# Altium PCB Main-PCB-v1.1.PcbDoc (part 2 of 2)
Units mil, origin at the board's own origin, x right, y up, seen from the top; angles counter-clockwise.
Board outline 2306.6 x 2155.25 mil, 2 copper layers (Top Layer, Bottom Layer), stack 57 mil thick; 70 components, 51 nets, 237 pads, 85 vias.
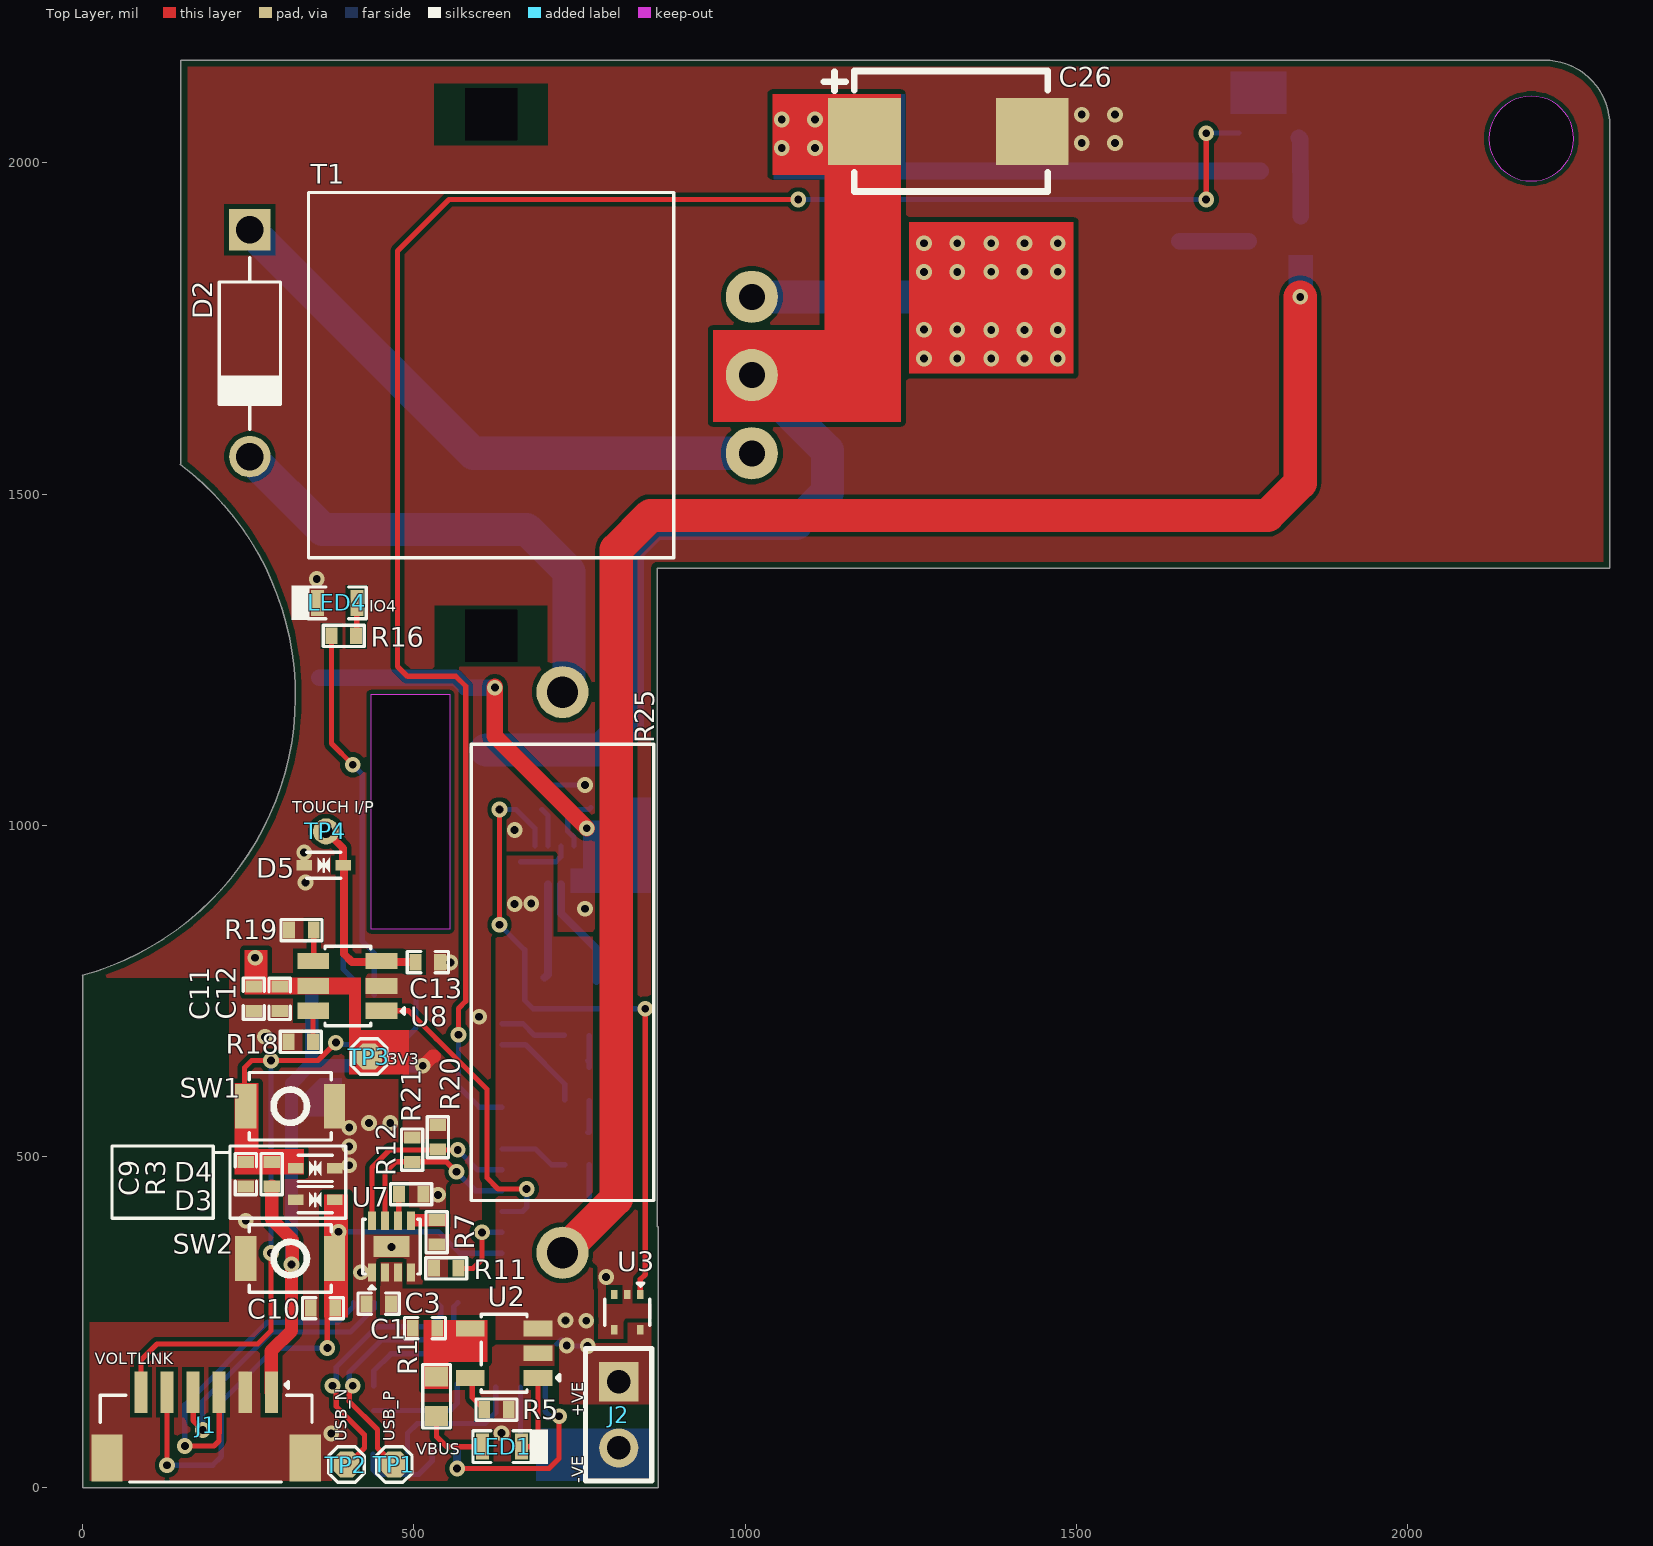
[diagram p0: Top Layer view]

## Part data (continued)
R27: library part RC0402FR-07680RL, "RES 680 OHM 1% 1/16W 0402", Case Code (Imperial)=0402, Case Code (Metric)=1005, Manufacturer=Yageo, Max Operating Temperature=155°C, Max Power Dissipation=63mW, Min Operating Temperature=-55°C, Resistance Tolerance=1%, Resistor Type="Thick Film", Supplier Part Number 1=7948052, Temperature Coefficient=100ppm/°C, Voltage Rating=50V, Case/Package=0402, Category="Chip SMD Resistors", ComponentLink1Description=https://datasheet.ciiva.com/12667/pyu-rc0402-51-rohs-l-6-r-12667916.pdf?src-supplier=Mouser, ComponentLink1URL=https://datasheet.ciiva.com/12667/pyu-rc0402-51-rohs-l-6-r-12667916.pdf?src-supplier=Mouser, ComponentLink2Description=https://datasheet.ciiva.com/7850/1018594-7850071.pdf?src-supplier=Element14, ComponentLink2URL=https://datasheet.ciiva.com/7850/1018594-7850071.pdf?src-supplier=Element14, ComponentLink3Description=https://datasheet.ciiva.com/7850/1018594-7850070.pdf?src-supplier=Element14, ComponentLink3URL=https://datasheet.ciiva.com/7850/1018594-7850070.pdf?src-supplier=Element14, ComponentLink4Description=https://datasheet.ciiva.com/17042/pyu-rc0402-51-rohs-l-6-r-17042399.pdf?src-supplier=Future+Electronics, ComponentLink4URL=https://datasheet.ciiva.com/17042/pyu-rc0402-51-rohs-l-6-r-17042399.pdf?src-supplier=Future+Electronics, Construction=Rectangular, Depth=0.5mm, Features="Moisture Resistant", Item Type=Resistor, Lead Free="Lead Free", Length=1mm, Manufacturer Part Number=RC0402FR-07680RL, Military Standard=Not, Number of Terminations=2, Packaging="Tape and Reel", Power Rating=63mW, Pricing 1="10000=0.0011, 100000=0.0011, 300000=0.001, 750000=0.001, 2000000=0.0009 (USD)", Reach SVHC Compliant=No, Resistance=680R, RoHS=Yes, RoHS Compliant=Yes, Series=RC, Size Code=0402, Stock 1=5080000, Supplier 1="Future Electronics", Termination=SMD/SMT, Tolerance=1%, Voltage Rating (AC)=50V
SW1 SW2: "SWITCH TACTILE SPST-NO 0.05A 12V", Contact Current Rating=50mA, Contact Resistance=100mR, Insulation Resistance=100MR, LCSC Part Number=C231329, Manufacturer=Omron, Max Operating Temperature=70°C, Max Voltage Rating (DC)=12V, Min Operating Temperature=-25°C, Operating Force=1.5N, Package Quantity=1, Ratings="Dust Proof,IP40", Supplier Part Number 1=SW1020DKR-ND, Actuator Length=0.4mm, Actuator Type=Standard, ComponentLink1Description=http://www.farnell.com/datasheets/60838.pdf?src-supplier=Farnell, ComponentLink1URL=http://www.farnell.com/datasheets/60838.pdf?src-supplier=Farnell, ComponentLink2Description=http://www.farnell.com/datasheets/60838.pdf?src-supplier=Element14, ComponentLink2URL=http://www.farnell.com/datasheets/60838.pdf?src-supplier=Element14, ComponentLink3Description=https://omronfs.omron.com/en_US/ecb/products/pdf/en-b3u.pdf?src-supplier=Digi-Key, ComponentLink3URL=https://omronfs.omron.com/en_US/ecb/products/pdf/en-b3u.pdf?src-supplier=Digi-Key, ComponentLink4Description=http://www.omron.com/ecb/products/pdf/en-b3u.pdf?src-supplier=Digi-Key, ComponentLink4URL=http://www.omron.com/ecb/products/pdf/en-b3u.pdf?src-supplier=Digi-Key, ComponentLink5Description=https://www.distrelec.biz/Web/Downloads/he/et/B3U_eng_datasheet.pdf?mime=application%2Fpdf&src-supplier=Distrelec, ComponentLink5URL=https://www.distrelec.biz/Web/Downloads/he/et/B3U_eng_datasheet.pdf?mime=application%2Fpdf&src-supplier=Distrelec, ComponentLink6Description=http://www.onlinecomponents.com/productFiles/mf-OM/en-b3u.pdf?src-supplier=Onlinecomponents.com, ComponentLink6URL=http://www.onlinecomponents.com/productFiles/mf-OM/en-b3u.pdf?src-supplier=Onlinecomponents.com, ComponentLink7Description=https://www.verical.com/server-webapp/html/getDatasheet?partID=552554&src-supplier=Verical, ComponentLink7URL=https://www.verical.com/server-webapp/html/getDatasheet?partID=552554&src-supplier=Verical, ComponentLink8Description=http://www.farnell.com/datasheets/1685550.pdf?src-supplier=Element14, ComponentLink8URL=http://www.farnell.com/datasheets/1685550.pdf?src-supplier=Element14, ComponentLink9Description=http://www.farnell.com/datasheets/2610940.pdf?src-supplier=Farnell, ComponentLink9URL=http://www.farnell.com/datasheets/2610940.pdf?src-supplier=Farnell, ComponentLink10Description=https://www.alliedelec.com/m/d/4c8a9ef82804fc3c241a13c1e298fd73.pdf?src-supplier=Allied+Electronics, ComponentLink10URL=https://www.alliedelec.com/m/d/4c8a9ef82804fc3c241a13c1e298fd73.pdf?src-supplier=Allied+Electronics, Contact Material=Silver, Current Rating=50mA, Depth=2.5mm, Electrical Life=200000Cycles, Height=1.2mm, Illumination Type=Non-Illuminated,Illuminated, Item Type=Switch, Lead Free="Lead Free", Length=4mm, Manufacturer Part Number=B3U-1000P, Max Current Rating=50mA, Mechanical Life=200000Cycles, Mount="Surface Mount", Orientation=Straight, Packaging="Tape and Reel", Pricing 1="1=1, 10=0.961, 25=0.9064, 50=0.7976, 100=0.7251, 250=0.68888, 500=0.67074, 1000=0.52571 (USD)", REACH SVHC=Unknown, Stock 1=116454, Supplier 1=Digi-Key, Switch Function=Off-Mom, Switch Travel=0.15mm, Termination=SMD/SMT, Throw Configuration=SPST, Voltage Rating (DC)=12V, Weight=0.000776oz, Width=3mm
T1: "15KV Arc Ignition High Voltage Inverter Step Up Boost Coil Transformer Pulse Ignition 1.4x1.4x0.7cm Lighter Accessories", Manufacturer=Aideepen, ComponentLink1Description=Aliexpress, ComponentLink1URL=https://vi.aliexpress.com/item/1005006061113490.html, Item Type=Transformer, Manufacturer Part Number="15KV step-up coil transformer"
TP1 TP2 TP3: "Test Point ON", Item Type="Test Point", Manufacturer Part Number="TEST POINT 0.5mm Dia"
TP4: "Test pad"
U1: "SOT-23-6 Battery Management ROHS", LCSC Part Number=C18186335, Manufacturer="Shenzhen Fuman Elec", Package=SOT-23-6, ComponentLink1Description=LCSC, ComponentLink1URL=https://www.lcsc.com/product-detail/Battery-Management_Shenzhen-Fuman-Elec-DW01-A-J_C18186335.html, Item Type=IC, Manufacturer Part Number=DW01-A/J
U2: "4.5V~5.5V 锂离子/Polymer 1 600mA SOT-23-5 Battery Management ICs ROHS", LCSC Part Number=C382138, Manufacturer=TPOWER, Package=SOT-23-5, ComponentLink1Description=LCSC, ComponentLink1URL=https://www.lcsc.com/product-detail/Battery-Management-ICs_TPOWER-TP4054_C382138.html, Item Type=IC, Manufacturer Part Number=TP4054
U3: "Active Low 1 VSOF-5 Monitors & Reset Circuits ROHS", Case/Package=VSOF, LCSC Part Number=C2067200, Manufacturer=Rohm, Max Operating Temperature=105°C, Max Power Dissipation=210mW, Max Reset Threshold Voltage=6.09V, Max Supply Current=1.98uA, Max Supply Voltage=10V, Min Operating Temperature=-40°C, Min Reset Threshold Voltage=5.91V, Min Supply Voltage=1.2V, Number of Voltages Monitored=1, Operating Supply Current=900nA, Package Quantity=3000, Supplier Part Number 1=1717448, Threshold Voltage=6V, Accuracy=1%, Category="Voltage Supervisors", ComponentLink1Description=https://datasheet.ciiva.com/1974/bd48xxg-e-1974994.pdf?src-supplier=Digi-Key, ComponentLink1URL=https://datasheet.ciiva.com/1974/bd48xxg-e-1974994.pdf?src-supplier=Digi-Key, ComponentLink2Description=https://datasheet.ciiva.com/8133/bd48xxg-e-8133113.pdf?src-supplier=Avnet, ComponentLink2URL=https://datasheet.ciiva.com/8133/bd48xxg-e-8133113.pdf?src-supplier=Avnet, ComponentLink3Description=LCSC, ComponentLink3URL=https://www.lcsc.com/product-detail/Monitors-Reset-Circuits_ROHM-Semicon-BD4830FVE-TR_C2067200.html, Item Type=IC, Lead Free="Lead Free", Manufacturer Part Number=BD4830FVE-TR, Mounting Technology="Surface Mount", Number of Monitored Inputs=1, Packaging="Tape and Reel", Pins=5, Pricing 1="1=0.64000, 10=0.54900, 25=0.51200, 100=0.40960, 250=0.38032, 500=0.32182, 1000=0.24868 (USD)", Reset="Active Low", RoHS=Yes, RoHS Compliant=Yes, Series=BD48xxx, Stock 1=5990, Supplier 1=Rs, Type="Simple Reset/Power-On Reset,Voltage Detector", Watchdog Timer=No
U4: "20V 6A 22mΩ@4.5V,4.5A 2W 2PCSNChannel(Common Drain) SOT-23-6 MOSFETs ROHS", LCSC Part Number=C841290, Manufacturer="Shenzhen Fuman Elec", Package=SOT-23-6, ComponentLink1Description=LCSC, ComponentLink1URL=https://www.lcsc.com/product-detail/MOSFETs_Shenzhen-Fuman-Elec-8205A_C841290.html, Item Type=IC, Manufacturer Part Number=.8205A
U5: "Non-Isolated PoL Module DC DC Converter 1 Output 1.2 ~ 5.3V 2A 1.6V - 5.5V Input", LCSC Part Number=C5219190, Manufacturer="Texas Instruments", Height=600um, Item Type=IC, Length=2.1mm, Manufacturer Part Number=TPS631000DRLR, Pins=8NUMBER, Pricing="1=1.49, 10=1.34, 50=1.34, 100=1.08, 1000=0.733, 10000=0.631 (USD)", RoHS=No, Stock=19488, Supplier=Mouser, Thickness=550um, Topology=6153TopologyType, Width=1.2mm
U6: "RF TXRX MODULE BT PCB TRACE SMD", LCSC Part Number=C2934569, Manufacturer="Espressif Systems", Package=SMD,13.2x16.6mm, Supplier Part Number=1965-ESP32-C3-MINI-1-H4CT-ND, Category=Uncategorized, ComponentLink1Description=LCSC, ComponentLink1URL=https://www.lcsc.com/product-detail/WiFi-Modules_Espressif-Systems-ESP32-C3-MINI-1-H4_C2934569.html, Item Type=Module, Manufacturer Part Number=ESP32-C3-MINI-1-H4, Pricing="1=1.9 (USD)", RoHS=No, Stock=35793, Supplier=Digi-Key
U7: "IC BATT MON LI-ION 1CELL 8TDFN", LCSC Part Number=C2682616, Manufacturer=Maxim, Max Operating Temperature=85°C, Min Operating Temperature=-20°C, Operating Supply Current=23uA, Operating Supply Voltage=4.5V, Output Voltage=400mV, Package Quantity=10000, Supplier Part Number 1=700-MAX17048G+T10, Category="Battery Management", ComponentLink1Description=https://datasheet.ciiva.com/14083/max17048-max17049-14083973.pdf?src-supplier=Digi-Key, ComponentLink1URL=https://datasheet.ciiva.com/14083/max17048-max17049-14083973.pdf?src-supplier=Digi-Key, Contact Plating=Tin,Matte, Item Type=IC, Manufacturer Part Number=MAX17048G+T10, Mount="Surface Mount", Number of Pins=8, Packaging="Tape and Reel", Pricing 1="1=3.34000, 10=3.00000, 50=2.84000, 100=2.46000, 1000=1.89000, 10000=1.83000 (USD)", Radiation Hardening=No, RoHS=Yes, RoHS Compliant=Yes, Series=ModelGauge™, Stock 1=41293, Supplier 1=Mouser
U8: "SOT-23-6L Touch Sensors ROHS", LCSC Part Number=C2890349, Manufacturer="Tontek Design Tech", Package=SOT-23-6L, ComponentLink1Description=LCSC, ComponentLink1URL=https://www.lcsc.com/product-detail/Touch-Sensors_Tontek-Design-Tech-TTP233H-BA6_C2890349.html, Item Type=IC, Manufacturer Part Number=TTP233H-BA6

## Via types
v1: diameter 23.62, hole 11.81, Top Layer to Bottom Layer, tented both sides, 84 vias
v2: diameter 23.62, hole 11.81, Top Layer to Bottom Layer, 1 vias

## Nets (pads, with @x,y where several pads share a name; then routed paths per layer and width w, separated by ;. In a path a pad name is that pad's centre, name@x,y a point inside that pad or via, vN(x,y) a via of type N, cw(c..) or ccw(c..) an arc to the next point about the centre after c; other vN are vias at no path point)
3V3: C5.2 C6.2 C7.2 C8.2 C11.2 C12.2 D1.2 J1.1 R3.1 R7.1 R9.2 R11.1 R15.1 R20.2 R21.2 TP3.1 U5.1 U6.3 U8.5 | length 1493.2
  Top Layer w20: J1.1 284.63,206.39 315.12,236.88 v1(315.12,336.88) 316.13,337.89 316.13,373.87 285.15,404.84 R3.1 ; v1(513.12,636.88) 514.1,636.88 528.51,651.29 530.53,651.29
  Top Layer w25: v1@622.12,1208.88 v1(622.12,1207.88) 622.12,1134.43 v1(760.98,995.57)
  Bottom Layer w20: v1(315.12,336.88) 315.12,609.88 342.12,636.88 ; U6.3 345.61,640.37 342.12,636.88 ; v1(513.12,636.88) 342.12,636.88
  Bottom Layer w25: 356.81,1222.88 563.12,1222.88 578.12,1207.88 v1(622.12,1207.88)
  other v1: 260.12,799.88
3V3_EN: R8.2 U3.1 U5.5 | length 1017.7
  Top Layer w8: v1(629.12,849.88) v1(629.12,1023.88) ; U3.1 841.8,314.56 849.29,322.05 849.29,698.43 v1(849.29,722.88)
  Bottom Layer w8: v1(629.12,849.88) 667.12,811.88 667.12,735.88 680.12,722.88 v1(849.29,722.88) ; v1(629.12,1023.88) R8.2 682.59,995.4 U5.5
ARC_IGNITER: R27.1 U6.16 | length 2834.5
  Top Layer w8: v1(567.12,683.88) 567.12,723.53 578.12,734.53 578.12,1209.88 563.12,1224.88 490.12,1224.88 475.12,1239.88 475.12,1866.88 553.12,1944.88 v1(1080.12,1944.88) ; v1(1696.03,1944.88) 1696.03,2043.79 1696.12,2043.88 v2(1696.12,2044.88)
  Bottom Layer w8: v1(567.12,683.88) 567.12,605.88 598.64,574.35 U6.16@632.98,574.35 ; v1(1080.12,1944.88) v1(1696.03,1944.88) v1@1698.12,1944.88 ; v2(1696.12,2044.88) 1696.62,2045.38 R27.1
BAT_ALERT: R7.2 U7.5
BATT: C3.2 C4.2 C26.1 J2.1 R2.2 R8.1 R26.1 T1.2 U2.3 U3.5 U5.4 U7.2 U7.3 | length 1753
  Bottom Layer w8: 715.12,216.88 716.12,216.88 722.77,223.53 729.58,216.73 729.58,214.53 730.23,213.88 v1(762.12,213.88) ; v1@730.8,213.88 v1(730.8,214.53)
  Bottom Layer w25: 1135.12,1987.86 R26.1
  Bottom Layer w50: 609.12,1113.88 783.12,1113.88 822.12,1152.88 822.12,1415.88 862.12,1455.88 1077.12,1455.88 1124.12,1502.88 1124.12,1565.77 T1.2
  other v1: 760,251.88 728.68,252.53 651.93,881.09 677,881.88 1055.28,2022.68 1105.53,2022.68 1055.28,2065.68 1105.53,2065.68
ESP_EN: C9.1 D3.2 J1.6 R3.2 SW1.2 U6.8 | length 1071.3
  Top Layer w8: J1.6 87.78,192.54 112.12,216.88 264.12,216.88 284.06,236.81 284.06,296.63 v1(284.06,354.14) ; SW1.2@246.22,570.86 244.12,572.96 244.12,633.88 255.12,644.88 v1(284.06,644.88) 355.12,644.88 v1(382.12,671.88)
  Bottom Layer w8: v1(284.06,354.14) v1(284.06,644.88) ; v1(382.12,671.88) 385.12,668.88 478.12,668.88 503.06,693.82 U6.8@503.06,743.65
GND: C1.1 C3.1 C4.1 C5.1 C6.1 C7.1 C8.1 C9.2 C10.2 C11.1 C12.1 C13.1 C26.2 D1.1 D3.1 D4.1 D5.1 J1.2 J1.MP1 J1.MP2 LED2.2 LED3.2 LED4.2 LED5.2 Q2.3 Q3.2 R5.1 R6.1 R12.1 R13.2 R14.1 R18.2 R19.2 R28.1 SW1.1 SW2.1 U2.2 U3.2 U3.4 U4.3 U5.7 U6.1 U6.2 U6.11 U6.14 U6.36 U6.37 U6.38 U6.39 U6.40 U6.41 U6.42 U6.43 U6.44 U6.45 U6.46 U6.47 U6.48 U6.49 U6.50 U6.51 U6.52 U6.53 U7.1 U7.4 U7.9 U8.2 | length 164.5
  Top Layer w8: D5.1 v1(334.12,958.88) v1(334.12,958.88)
  Bottom Layer w8: 661.04,944.88 714.12,944.88 721.96,952.72 U5.7 ; R13.2 v1(758.31,1060.88)
  other v1: 375.16,81.58 632.22,82.29 790.12,317.88 420.01,324.91 466.12,363.44 246.12,402.88 536.19,441.95 402.16,486.58 402.12,515.08 402.16,543.58 432.16,550.58 464.16,550.58 275.16,680.58 598.36,710.95 555.01,792.91 758.31,873.88 336.16,913.58 651.93,992.88 353.12,1371.88 1508.25,2030.07 1558.5,2030.07 1508.25,2073.07 1558.5,2073.07
I2C_SCL: R21.1 U6.20 U7.7 | length 276
  Top Layer w8: U7.7 456.27,476.03 472.12,491.88 R21.1 549.12,491.88 v1(564.19,476.8) v1@563.12,475.73
  Bottom Layer w8: v1(564.19,476.8) 592.62,448.37 U6.20@632.98,448.37
I2C_SDA: R20.1 U6.19 U7.8 | length 300.3
  Top Layer w8: U7.8 436.59,483.22 463.25,509.88 v1(566.12,509.88)
  Bottom Layer w8: v1(566.12,509.88) 596.18,479.81 632.92,479.81 U6.19@632.98,479.87
IO0: R4.1 U6.12 | length 101.4
  Bottom Layer w8: U6.12@632.98,700.34 664.65,700.34 682.12,682.88 R4.1
IO1: R10.1 U6.13 | length 143.5
  Bottom Layer w8: U6.13@632.98,668.84 668.15,668.84 727.64,609.35 R10.1
IO2: R15.2 U6.5 | length 63.1
  Bottom Layer w8: R15.2 393.12,782.88 408.57,767.42 U6.5@408.57,743.65
IO3: R16.1 U6.6 | length 568.9
  Top Layer w8: R16.1 375.62,1123.38 v1(407.62,1091.38)
  Bottom Layer w8: v1(407.62,1091.38) 422.12,1076.88 422.12,824.88 440.06,806.93 U6.6@440.06,743.65
IO4: R17.1 U6.18 | length 104.6
  Bottom Layer w8: U6.18@632.98,511.36 683.63,511.36 707.59,487.4 R17.1
IO8: R11.2 U6.22 | length 112.5
  Top Layer w8: R11.2 589.12,330.88 602.62,344.38 v1(602.62,385.38)
  Bottom Layer w8: v1(602.62,385.38) U6.22@632.98,385.38
IO9: C10.1 D4.2 J1.5 SW2.2 U6.23 | length 878.6
  Top Layer w8: v1(127.12,33.88) J1.5 ; v1(369.2,210.79) 369.2,336.96 SW2.2@382.12,349.88
  Bottom Layer w8: v1(127.12,33.88) 196.12,33.88 209.12,46.88 209.12,129.66 289.83,210.38 368.78,210.38 v1(369.2,210.79) ; v1(386.12,386.26) 536.74,386.26 569.11,353.88 U6.23@632.98,353.88
NetC2_1: C2.1 U1.6 | length 160.5
  Bottom Layer w8: C2.1 554.62,116.38 565.12,126.88 U1.6
NetC2_2: C2.2 R2.1 U1.5 | length 225.7
  Bottom Layer w8: C2.2 439.12,175.88 465.12,201.88 518.88,201.88 ; U1.5 527.72,193.04 518.88,201.88 ; R2.1 547.12,213.88 535.12,201.88 518.88,201.88
NetD2_1: D2.1 T1.3 | length 897.7
  Bottom Layer w50: D2.1 589.61,1561.66 T1.3
NetD2_2: D2.2 R25.1 | length 739.8
  Bottom Layer w50: D2.2 361.87,1446.88 670.12,1446.88 734.12,1382.88 734.12,1211.06 R25.1
NetJ2_2: J2.2 U4.1 | length 108
  Bottom Layer w20: U4.1@698.04,61.96 700.13,59.86 J2.2@805.15,59.86
NetL1_1: L1.1 U5.2 | length 168.2
  Bottom Layer w12: U5.2 721.96,867.03 775.52,813.47 L1.1@775.52,764.88
NetL1_2: L1.2 U5.3 | length 143.1
  Bottom Layer w12: L1.2@697.31,769.88 702.27,774.84 702.27,866.03 U5.3
NetLED1_1: LED1.1 R1.1 | length 106.7
  Top Layer w8: R1.1 534.12,76.88 549.12,61.88 LED1.1
NetLED1_2: LED1.2 U2.1 | length 121.7
  Top Layer w8: LED1.2 676.12,61.88 687.33,73.09 U2.1
NetLED2_1: LED2.1 R4.2 | length 48.3
  Bottom Layer w8: LED2.1@762.12,644.88 LED2.1@762.64,644.35 ; LED2.1 R4.2@764.64,682.35
NetLED3_1: LED3.1 R10.2 | length 48.3
  Bottom Layer w8: LED3.1@762.12,536.06 LED3.1@762.64,536.58 ; LED3.1@764.64,536.58 R10.2@764.64,584.11
NetLED4_1: LED4.1 R16.2 | length 50
  Top Layer w8: R16.2@413.64,1285.88 LED4.1
NetLED5_1: LED5.1 R17.2 | length 47.5
  Bottom Layer w8: LED5.1 R17.2
NetQ1_1: Q1.1 Q3.3 R26.2 | length 119.8
  Bottom Layer w25: Q3.3@1836.12,2037.88 1838.15,2035.84 R26.2 1838.89,1987.12 Q1.1
NetQ1_2: Q1.2 R25.2 | length 2450.6
  Top Layer w50: R25.2 805.48,435.95 805.48,859.09 805.48,1416.24 857.12,1467.88 1789.12,1467.88 1838.12,1516.88 v1(1838.12,1797.88)
NetQ1_3: Q1.3 Q2.1 | length 104.3
  Bottom Layer w25: Q2.1 1760.11,1881.82 Q1.3
NetQ2_2: Q2.2 T1.1 | length 381.6
  Bottom Layer w10: Q2.2@1357.1,1791.86 Q2.2
  Bottom Layer w50: T1.1 1367.13,1797.88 Q2.2
  other v1: 1270.12,1704.88 1320.37,1704.88 1371.62,1704.88 1421.87,1704.88 1472.12,1704.88 1270.12,1748.37 1320.37,1748.37 1371.62,1747.88 1421.87,1747.88 1472.12,1747.88 1270.12,1835.35 1320.37,1835.35 1371.62,1835.84 1421.87,1835.84 1472.12,1835.84 1270.12,1878.84 1320.37,1878.84 1371.62,1878.84 1421.87,1878.84 1472.12,1878.84
NetQ3_1: Q3.1 R27.2 R28.2
NetR5_2: R5.2 U2.5 | length 55.1
  Top Layer w8: U2.5@587.97,165.46 587.97,136.02 R5.2
NetR6_2: R6.2 U1.2 | length 138.8
  Bottom Layer w8: R6.2 438.12,26.88 445.12,19.88 507.7,19.88 507.7,20.61 527.72,40.63 U1.2
NetR9_1: R9.1 R14.2 U5.8 | length 95.3
  Bottom Layer w8: U5.8 741.64,981.35 732.12,990.88 R14.2 764.12,1023.88 R9.1
NetR12_2: R12.2 U7.6 | length 40.5
  Top Layer w8: U7.6 477.13,404.03 R12.2
NetR13_1: R13.1 U5.6 | length 58.9
  Bottom Layer w8: R13.1 702.27,1014.72 U5.6
NetR18_1: R18.1 U8.6 | length 47
  Top Layer w8: R18.1 U8.6@347.39,720.06
NetR19_1: R19.1 U8.4 | length 47
  Top Layer w8: U8.4@348.62,794.86 R19.1
NetU1_1: U1.1 U4.6 | length 310.2
  Top Layer w8: v1(565.12,28.88) 704.12,28.88 719.12,43.88 v1(719.12,107.69)
  Bottom Layer w8: U4.6 698.12,114.88 705.31,107.69 v1(719.12,107.69)
  Bottom Layer w12: v1(565.12,28.88) U1.1
NetU1_3: U1.3 U4.4 | length 213
  Bottom Layer w8: U1.3 490.31,82.07 505.12,96.88 607.12,96.88 623.31,113.07 U4.4
NetU4_2: U4.2 U4.5 | length 103.1
  Bottom Layer w8: U4.2 U4.5
RXD: J1.4 U6.30 | length 432.1
  Top Layer w8: J1.4 166.52,101.47 v1(181.12,86.88)
  Bottom Layer w8: v1(181.12,86.88) 181.12,130.66 285.33,234.88 404.12,234.88 440.06,270.82 U6.30@440.06,279.08
TOUCH_I/P: C13.2 D5.2 TP4.1 U8.3 | length 309.7
  Top Layer w12: TP4.1@367.12,991.21 393.12,965.21 D5.2 ; D5.2@394.12,939.88 394.12,805.88 406.54,793.46 451.15,793.46 C13.2
TOUCH_SIG: U6.21 U8.1 | length 476.3
  Top Layer w8: U8.1 491.46,720.06 509.64,701.88 533.62,677.9 610.12,601.4 610.12,467.88 627.12,450.88 v1(670.12,450.88)
  Bottom Layer w8: U6.21@632.98,416.87 664.11,416.87 670.12,422.88 v1(670.12,450.88)
TXD: J1.3 U6.31 | length 511.9
  Top Layer w8: v1(154.12,62.88) 167.67,62.88 198.19,62.88 205.74,70.43 205.74,82.72 205.89,82.88 J1.3
  Bottom Layer w8: v1(154.12,62.88) 154.12,124.88 279.12,249.88 385.12,249.88 408.57,273.33 U6.31@408.57,279.08
USB_N: TP1.1 U6.26 | length 391.9
  Top Layer w8: v1(407.68,153.88) 402.12,148.32 402.12,130.45 444.9,87.67 444.9,60.01 TP1.1
  Bottom Layer w8: v1(407.68,153.88) 402.12,159.44 402.12,173.88 451.62,223.38 531.63,223.38 560.05,251.8 560.05,273.08 U6.26@566.05,279.08
USB_P: TP2.1 U6.27 | length 391.9
  Top Layer w8: v1(377.06,153.88) 382.62,148.32 382.62,122.38 425.4,79.59 425.4,60.01 TP2.1@400.12,34.73
  Bottom Layer w8: v1(377.06,153.88) 382.62,159.44 382.62,181.95 443.54,242.88 523.55,242.88 540.55,259.88 540.55,273.08 U6.27@534.55,279.08
VBUS: C1.2 R1.2 U2.4
pads on no net: T1.4 U1.4 U3.3 U6.4 U6.7 U6.9 U6.10 U6.15 U6.17 U6.24 U6.25 U6.28 U6.29 U6.32 U6.33 U6.34 U6.35

## Polygon pours and split planes (outlines as drawn)
GND on Top Layer "GND_L01_P007" (solid, remove dead copper, pour order 7): -5.02,0 -5.02,773.35 cw(c0,773.35) -1.33,778.18 ccw(c-115.65,1195.5) 317.04,1195.5 ccw(c-115.65,1195.5) 145.13,1540.77 143.11,1544.79 143.11,2155.25 cw(c148.12,2155.25) 148.12,2160.27 2207.18,2160.27 cw(c2207.18,2056.83) 2310.62,2056.83 2310.62,1387.8 cw(c2305.6,1387.8) 2305.6,1382.78 873.61,1382.78 873.61,0 cw(c868.6,0) 868.6,-5.01 0,-5.01 cw(c0,0)
BATT on Top Layer "BATT_L01_P005" (solid, remove dead copper, pour order 5): 770.12,831.88 710.12,831.88 710.12,953.88 623.12,953.88 623.12,299.88 482.12,299.88 482.12,339.88 449.12,339.88 449.12,260.88 623.12,260.88 623.12,222.88 719.12,222.88 719.12,125.88 862.12,125.88 862.12,248.88 823.12,248.88 823.12,217.88 771.12,217.88 771.12,298.88 770.12,298.88
3V3 on Top Layer "3V3_L01_P008" (solid, remove dead copper, pour order 8): 555.12,382.88 555.12,460.56 574.12,460.56 574.12,517.88 483.12,517.88 483.12,690.88 602.12,690.88 602.12,317.88 517.12,317.88 517.12,382.88
GND on Bottom Layer "GND_L02_P006" (solid, remove dead copper, pour order 6): -5.02,0 -5.02,773.35 cw(c0,773.35) -1.33,778.18 ccw(c-115.65,1195.5) 317.04,1195.5 ccw(c-115.65,1195.5) 145.13,1540.77 143.11,1544.79 143.11,2155.25 cw(c148.12,2155.25) 148.12,2160.27 2207.18,2160.27 cw(c2207.18,2056.83) 2310.62,2056.83 2310.62,1387.8 cw(c2305.6,1387.8) 2305.6,1382.78 873.61,1382.78 873.61,0 cw(c868.6,0) 868.6,-5.01 0,-5.01 cw(c0,0)
3V3 on Bottom Layer "3V3_L02_P010" (solid, remove dead copper, pour order 10): 272.12,1234.88 245.12,1234.88 245.12,785.88 313.12,785.88 336.12,762.88 336.12,728.88 356.12,728.88 356.12,827.88 410.12,827.88 410.12,871.88 298.12,871.88 298.12,980.88 351.12,1056.88 386.12,1091.88 386.12,1234.88
BATT on Bottom Layer "BATT_L02_P004" (solid, remove dead copper, pour order 4): 859.12,270.88 687.12,270.88 687.12,232.88 616.12,232.88 616.12,196.88 742.12,196.88 742.12,124.88 859.12,124.88
BATT on Bottom Layer "BATT_L02_P003" (solid, remove dead copper, pour order 3): 690.12,892.88 690.12,868.88 630.12,868.88 630.12,892.88 584.12,892.88 584.12,1138.88 667.12,1138.88 667.12,1048.88 619.12,1048.88 619.12,927.88 690.12,927.88

## Other copper
Top Layer:
  rectangle net BATT: 1041.12,1981.88 1225.12,2103.88
  rectangle net NetQ2_2: 1247.12,1681.88 1496.12,1910.88
  rectangle net 3V3: 402.12,623.88 492.12,690.88
  rectangle net 3V3: 402.12,661.88 420.12,769.88
  rectangle net VBUS: 514.12,148.88 552.12,252.88
  rectangle net ESP_EN: 229.12,472.88 334.12,510.88
  rectangle net ESP_EN: 229.12,482.88 265.12,610.88
  rectangle net IO9: 364.12,256.88 400.12,442.88
  rectangle net 3V3: 244.12,744.88 279.12,811.88
  rectangle net 3V3: 244.12,744.88 415.12,769.88
  rectangle net BAT_ALERT: 490.4,393.88 548.12,412.88
  rectangle net VBUS: 523.12,189.88 611.12,252.88
  rectangle net BATT: 951.12,1608.88 1235.12,1747.88
  rectangle net BATT: 1120.12,1662.88 1235.12,2103.88
  pour cut-out: 5.18,769.47 5.18,249.88 221.12,249.88 221.12,769.47
Bottom Layer:
  rectangle net NetQ3_1: 1733.12,2073.88 1817.12,2137.88
  rectangle net NetJ2_2: 684.12,9.88 859.12,88.88
  rectangle net BATT: 1043.12,1975.36 1242.12,2104.36
  rectangle net 3V3: 755.12,928.88 800.12,1006.88
  rectangle net NetQ1_2: 1820.12,1784.88 1857.12,1860.88
  rectangle net 3V3: 792.12,897.88 858.12,1041.88
  rectangle net 3V3: 736.12,897.88 855.12,934.88
  pour cut-out: 5.18,769.47 5.18,249.88 221.12,249.88 221.12,769.47

## Silkscreen, mask and mechanical layers (free items; w line width, h text height)
Top Overlay:
  lines w5: 200.12,505.88 220.12,505.88 221.12,506.88 ; 44.12,406.88 197.12,406.88 197.12,515.88 44.12,515.88 44.12,406.88 ; 222.12,406.88 222.12,515.88 397.12,515.88 397.12,406.88 222.12,406.88
  text "IO4" at 432.17,1316.43 h30
  text "TOUCH I/P" at 315.86,1013.12 h30
  text "3V3" at 460.12,632.38 h30
  text "VOLTLINK" at 18.15,180.36 h30
  text "+VE" at 761.71,106.88 h30 r90
  text "USB_N" at 404.87,69.86 h30 r90
  text "USB_P" at 476.93,69.86 h30 r90
  text "VBUS" at 503.59,43.38 h30
  text "-VE" at 761.71,6.88 h30 r90
Bottom Overlay:
  text "IO0" at 746.12,615.38 h30
  text "IO1" at 746.12,517.9 h30
  text "IO4" at 746.12,420.43 h30
Mechanical 1:
  lines w10: -1,773.35 -1,393.7 867.6,393.7 ; 0,773.35 ccw(c-115.65,1195.5) 148.12,1544.79 ; 147.12,1544.79 147.12,1958.4 1812.48,1958.4 cw(c1812.48,1859.98) 1910.9,1859.98 1910.9,1387.8 ; 868.6,393.7 868.6,1387.8 1911.9,1387.8 ; 1792.79,1958.4 ccw(c1792.79,1840.29) 1910.9,1840.29 ; 2187.49,2155.25 ccw(c2187.49,2037.14) 2305.6,2037.14
Board_Outline:
  circle w10: c2187.49,2037.14 r63.98
  lines w10: -1,773.35 ccw(c-116.65,1195.5) 147.12,1544.79 ; 0,773.35 0,393.7 0,0 868.6,0 868.6,393.7 ; 148.12,1544.79 148.12,1958.4 148.12,2155.25 2207.18,2155.25 cw(c2207.18,2056.83) 2305.6,2056.83 2305.6,1584.65 2305.6,1387.8 1911.9,1387.8 ; 867.6,393.7 867.6,1387.8 1910.9,1387.8 ; 435.53,843.33 435.53,1197.66 553.64,1197.66 553.64,843.33 435.53,843.33

## Dimensions
867.6,1387.8 to 868.6,0 on Mechanical 1
2207.18,2155.25 to 2305.6,1387.8 on Mechanical 1
0,0 to 868.6,0 on Mechanical 1
148.12,2155.25 to 0,0 on Mechanical 1
868.6,1387.8 to 2305.6,1387.8 on Mechanical 1
148.12,2155.25 to 2305.6,2056.83 on Mechanical 1
148.12,2155.25 to 148.12,1958.4 on Mechanical 1
868.6,393.7 to 868.6,0 on Mechanical 1
1911.9,1387.8 to 2305.6,1387.8 on Mechanical 1